# Altium PCB 328P_Board.PcbDoc
Units mm, origin at the board's own origin, x right, y up, seen from the top; angles counter-clockwise.
Board outline 78 x 66 mm, 2 copper layers (Top Layer, Bottom Layer), stack 1.569 mm thick; 71 components, 30 nets, 196 pads, 103 vias.
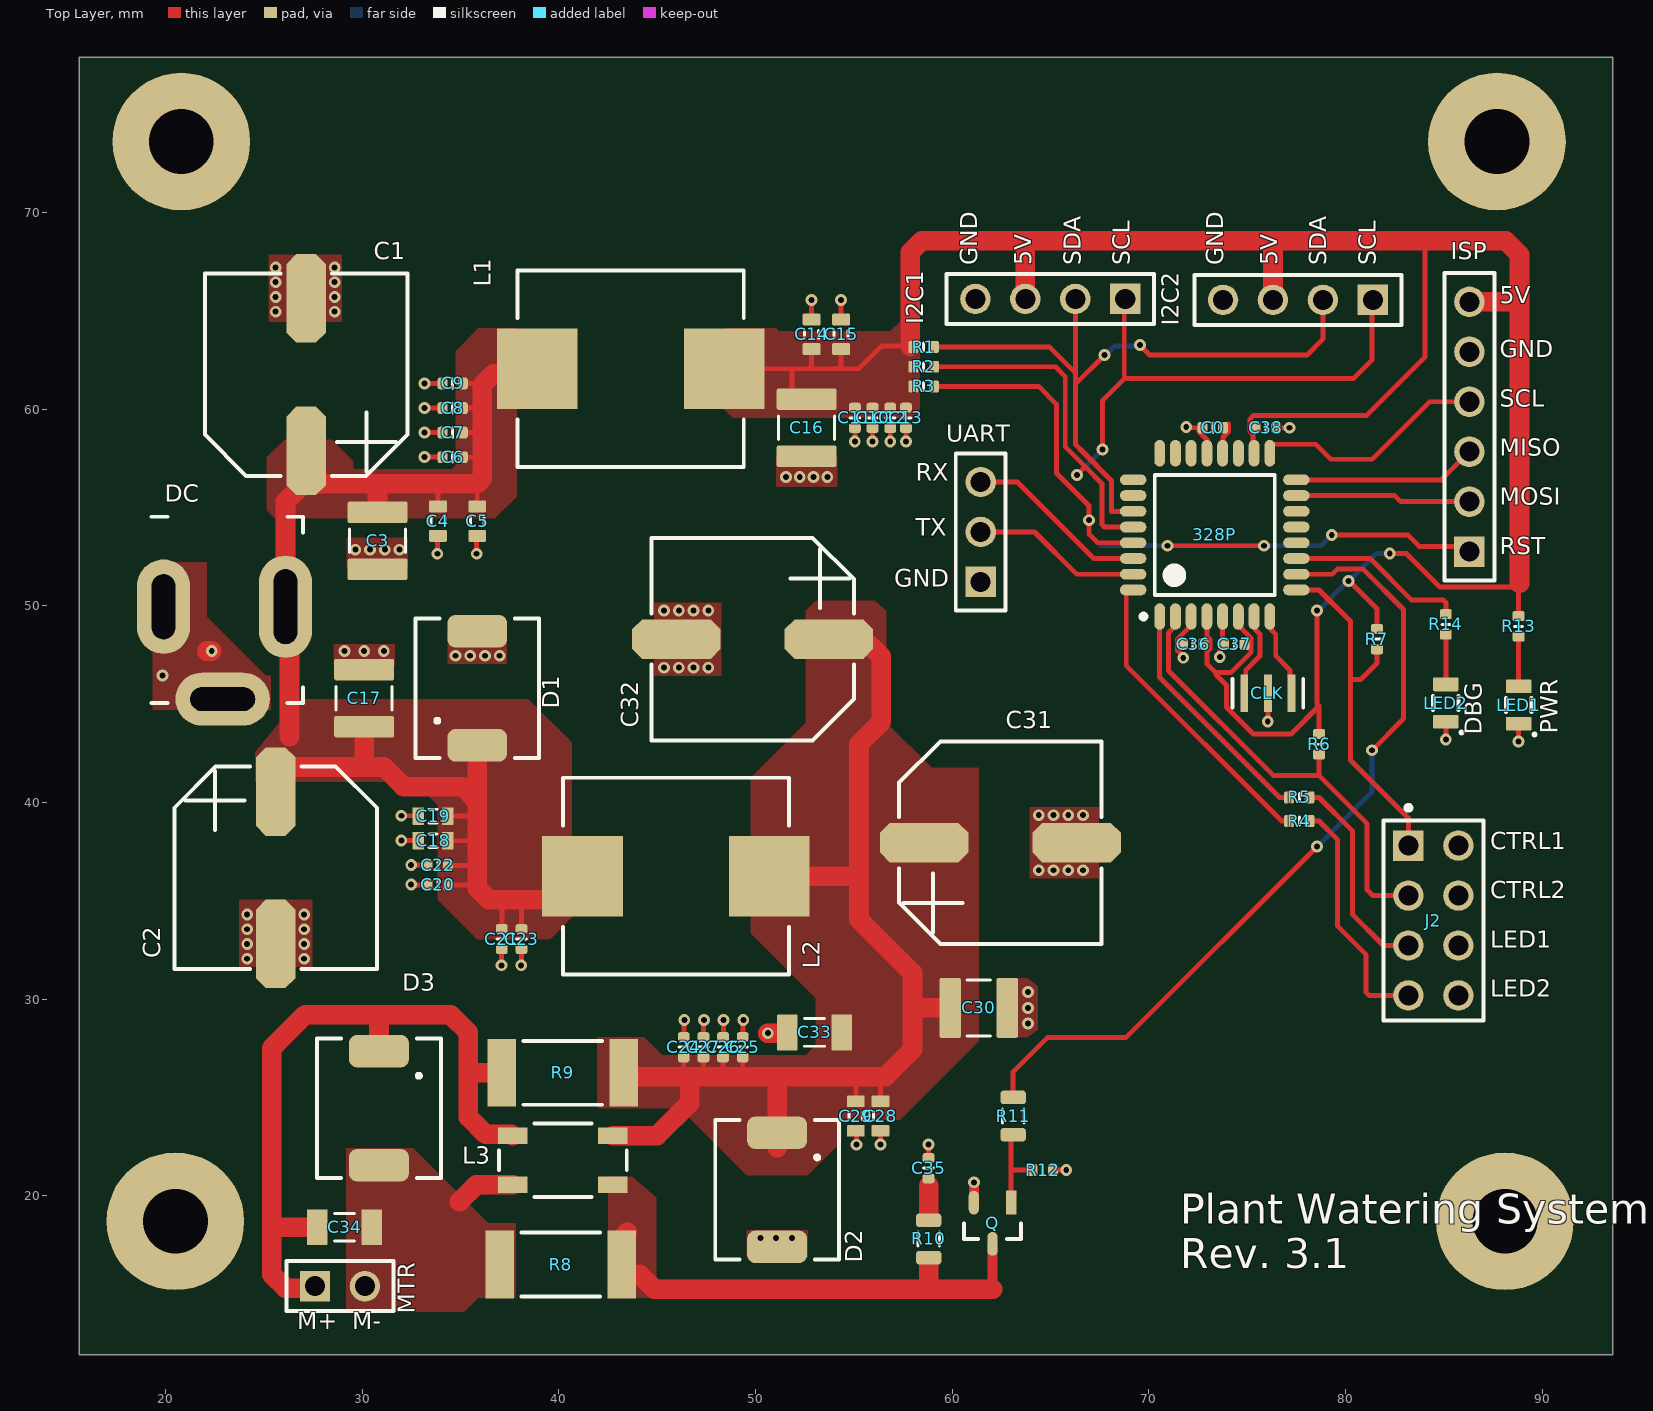
[diagram p0: Top Layer view]
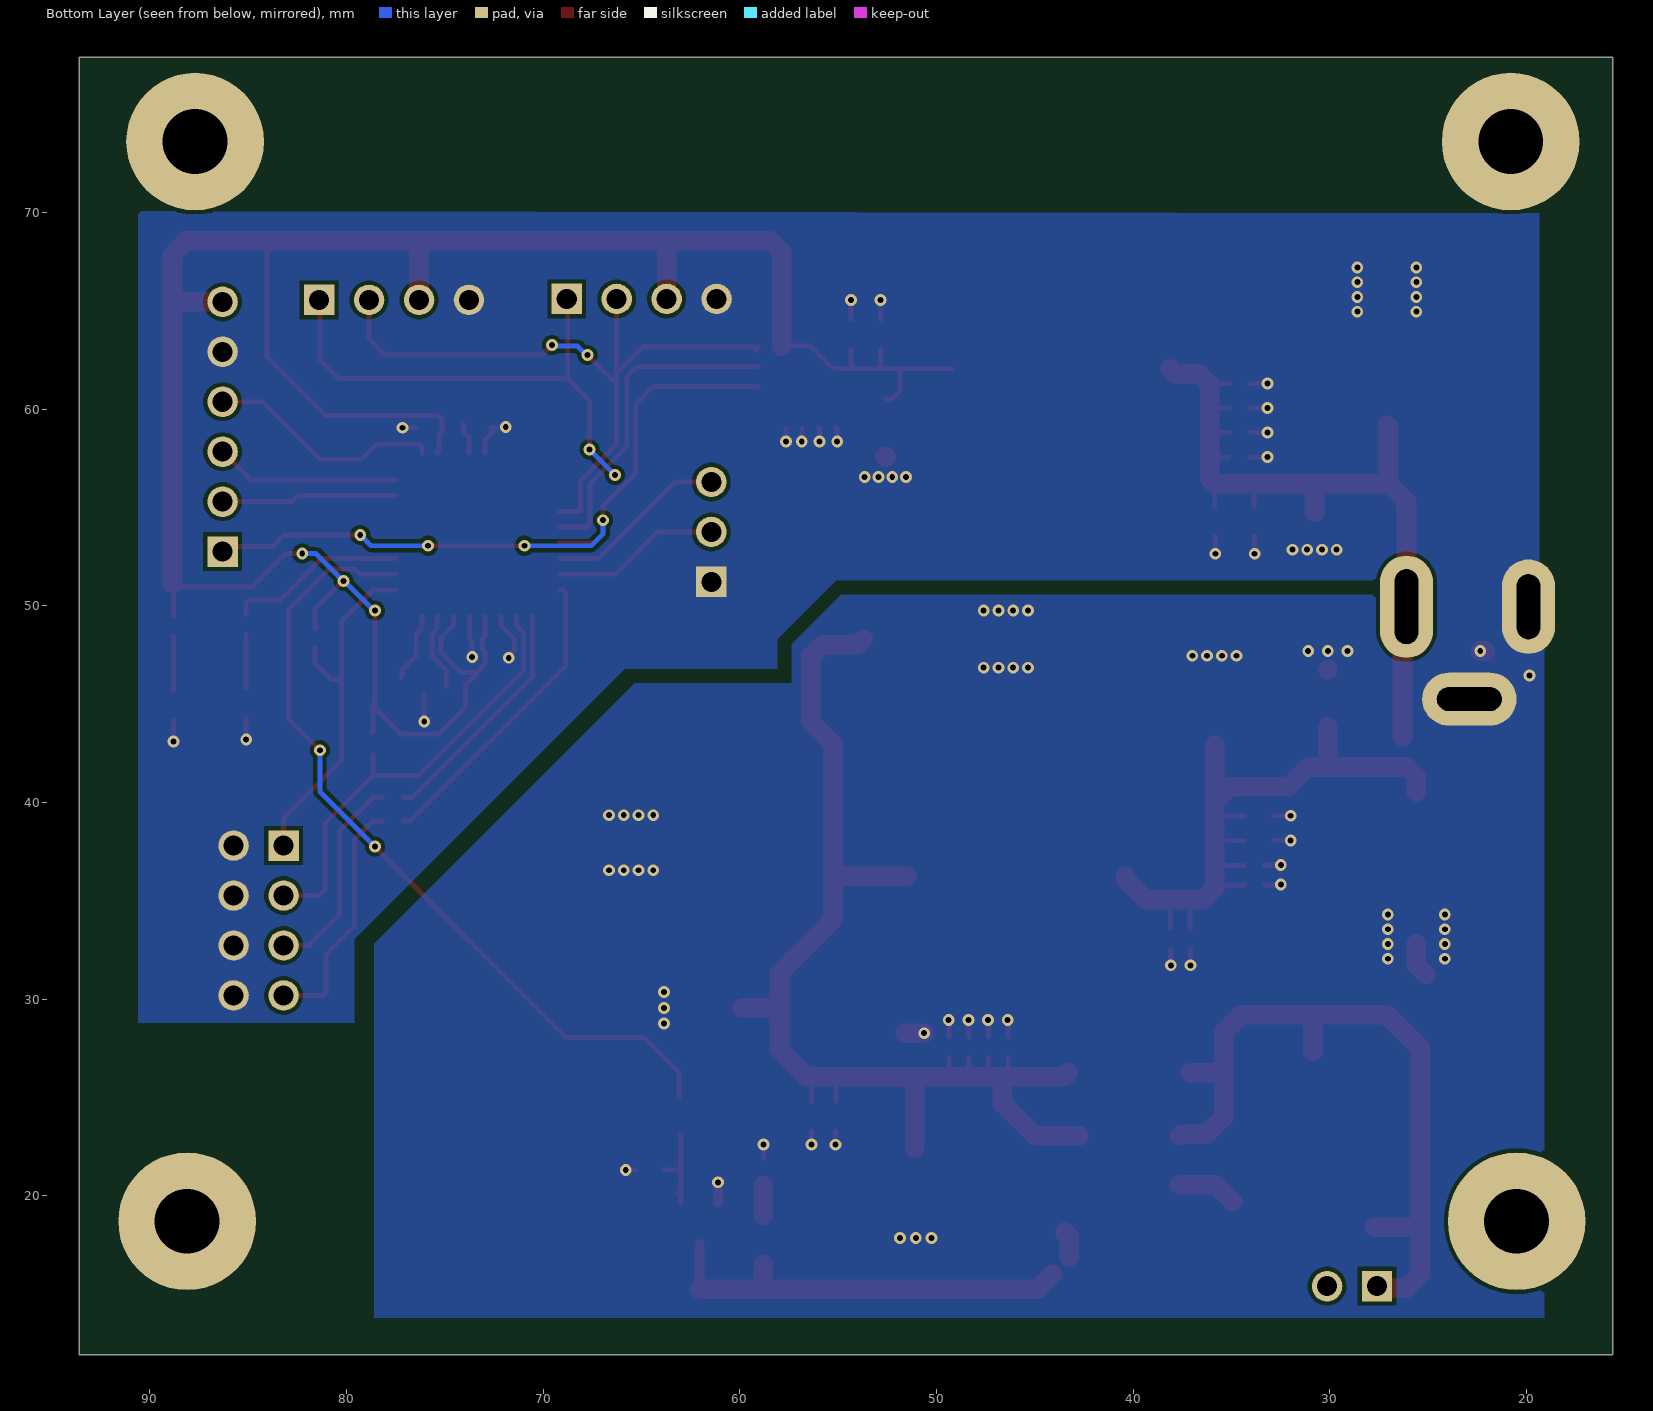
[diagram p1: Bottom Layer view, seen from below]

## Layer stack, top to bottom
Top Solder: solder mask 0.0254, SM-001, Dk 4
Top Layer: signal copper 0.035
Dielectric 1: core 1.4986, Core-043, Dk 4.3
Bottom Layer: signal copper 0.035
Bottom Solder: solder mask 0.0254, SM-001, Dk 4

## Board outline
15.6,11.9 93.6,11.9 93.6,77.9 15.6,77.9

## Design rules (kind name [scope] priority, off if disabled: settings)
AssemblyTestPointUsage [All] p1: isadvanced=TRUE
AssemblyTestpoint [All] p1: isadvanced=TRUE testpointundercomponent=TRUE minsize=1.016 maxsize=2.54 preferedsize=1.524 minholesize=0 maxholesize=1.016 preferedholesize=0.813 testpointgrid=0.025 usegrid=TRUE gridtolerance=0 allowsidetop=TRUE allowsidebottom=TRUE
Clearance Clearance_1 [OnMid vs OnMid] p1: gap=0.2 ignorepadtopadclearanceinfootprint=FALSE sourcerule=37 cellrowname=All cellrowtype=0 cellcolname=All cellcoltype=0 innerlayers=TRUE
Clearance Clearance_2 [(ExistsOnLayer('Top Layer') Or ExistsOnLayer('Bottom Layer')) vs (ExistsOnLayer('Top Layer') Or ExistsOnLayer('Bottom Layer'))] p2: gap=0.2 ignorepadtopadclearanceinfootprint=FALSE sourcerule=37 cellrowname=All cellrowtype=0 cellcolname=All cellcoltype=0 outerlayers=TRUE
Clearance [All] p3: gap=0.254 ignorepadtopadclearanceinfootprint=FALSE ismatrix=TRUE
ComponentClearance [All] p1: isadvanced=TRUE gap=0.254 collisioncheckmode=3 verticalgap=0.254 showdistances=FALSE
FabricationTestPointUsage [All] p1: isadvanced=TRUE valid=0 allowmultiple=FALSE
FabricationTestpoint [All] p1: isadvanced=TRUE side=3 testpointundercomponent=TRUE minsize=1.016 maxsize=2.54 preferedsize=1.524 minholesize=0 maxholesize=1.016 preferedholesize=0.813 testpointgrid=0.025 allowsidetop=TRUE allowsidebottom=TRUE usegrid=TRUE gridtolerance=0
FanoutControl Fanout_BGA [IsBGA] p1: isadvanced=TRUE bgadir=Out bgaviamode=Centered fanoutstyle=Auto fanoutdirection=Alternating viagrid=0.025 // Fanout_BGA (Default Rule)
FanoutControl Fanout_LCC [IsLCC] p2: isadvanced=TRUE bgadir=Out bgaviamode=Centered fanoutstyle=Auto fanoutdirection=Alternating viagrid=0.025 // Fanout_LCC (Default Rule)
FanoutControl Fanout_SOIC [IsSOIC] p3: isadvanced=TRUE bgadir=Out bgaviamode=Centered fanoutstyle=Auto fanoutdirection=Alternating viagrid=0.025 // Fanout_SOIC (Default Rule)
FanoutControl Fanout_Small [(CompPinCount < 5)] p4: isadvanced=TRUE bgadir=Out bgaviamode=Centered fanoutstyle=Auto fanoutdirection=OutThenIn viagrid=0.025 // Fanout_Small (Default Rule)
FanoutControl Fanout_Default [All] p5: isadvanced=TRUE bgadir=Out bgaviamode=Centered fanoutstyle=Auto fanoutdirection=Alternating viagrid=0.025 // Fanout_Default (Default Rule)
Height [All] p1: isadvanced=TRUE minheight=0 maxheight=25.4 prefheight=12.7
HoleSize [All] p1: isadvanced=TRUE absolutevalues=TRUE maxlimit=4 minlimit=0.2 maxpercent=80.000 minpercent=20.000
HoleToHoleClearance [All] p1: isadvanced=TRUE gap=0.3 allowstackedmicrovias=FALSE
LayerPairs [All] p1: isadvanced=TRUE enforce=TRUE
MinimumSolderMaskSliver [All] p1: isadvanced=TRUE minsoldermaskwidth=0.1
NetAntennae [All] p1: isadvanced=TRUE netantennaetolerance=0
PasteMaskExpansion [All] p1: isadvanced=TRUE expansion=0
PlaneClearance [All] p1: isadvanced=TRUE clearance=0.508
PlaneConnect [All] p1: isadvanced=TRUE planeconnectstyle=Relief reliefexpansion=0.508 reliefentries=4 reliefconductorwidth=0.254 reliefairgap=0.254
PolygonConnect [All] p1: connectstyle=Direct reliefconductorwidth=0.254 reliefentries=4 polygonreliefangle="90 Angle" airgapwidth=0.254
RoutingCorners [All] p1: isadvanced=TRUE cornerstyle=45-Degree minsetback=2.54 maxsetback=2.54
RoutingPriority [All] p1: isadvanced=TRUE routingpriority=0
RoutingVias [All] p1: holewidth=0 width=0.25 viastyle="Through Hole" minholewidth=0 minwidth=0.25 maxholewidth=0 maxwidth=0.25 useviatemplates=TRUE viatemplateguid#1={74C4EE52-B9B1-4AED-8B69-AA0912880850} viatemplatename#1=v60h30
ShortCircuit [All] p1: isadvanced=TRUE allowed=FALSE
SilkToSilkClearance [All] p1: isadvanced=TRUE silktosilkclearance=0.1
SilkToSolderMaskClearance [IsPad] p1: isadvanced=TRUE minsilkscreentomaskgap=0.1 clearancetoexposedcopper=TRUE
SolderMaskExpansion SolderMaskExpansionVia [IsVia] p1: isadvanced=TRUE expansion=0.05 istentingtop=FALSE useseparateexpansions=TRUE expansionbottom=0.05 istentingbottom=FALSE soldermaskfromhole=TRUE
SolderMaskExpansion [All] p2: isadvanced=TRUE expansion=0.05 istentingtop=FALSE
UnRoutedNet [All] p1: isadvanced=TRUE
UnpouredPolygon [All] p1: isadvanced=TRUE
Width [All] p1: maxlimit=1 minlimit=0.25 preferedwidth=1 minimp=50.000000 maximp=50.000000 favimp=50.000000
4 further rules are at their usual default settings.

## Classes and differential pairs
net class Power: GND

## Components (designator, comment, footprint, x,y, rotation, side; value= is the part's Value field where it differs from the comment)
328P "ATMEGA328P-AU" 32A_L 73.35,53.6 r90 top
C0 "100n" CAPC1005X55 73.25,59.05 r0 top
C1 "470u" CAPAE100X105 27.15,61.75 r180 top
C2 "470u" CAPAE100X105 25.6,36.675 r0 top
C3 "47u" CAPC3225X270 30.781,53.299 r90 top
C4 "2u2" CAPC1608X90 33.85,54.3 r90 top
C5 "2u2" CAPC1608X90 35.85,54.3 r90 top
C6 "100n" CAPC1005X55 34.6,57.55 r0 top
C7 "100n" CAPC1005X55 34.6,58.8 r0 top
C8 "100n" CAPC1005X55 34.6,60.05 r0 top
C9 "100n" CAPC1005X55 34.6,61.3 r0 top
C10 "100n" CAPC1005X55 55.95,59.55 r90 top
C11 "100n" CAPC1005X55 55.05,59.55 r90 top
C12 "100n" CAPC1005X55 56.85,59.55 r90 top
C13 "100n" CAPC1005X55 57.65,59.55 r90 top
C14 "2u2" CAPC1608X90 52.85,63.8 r90 top
C15 "2u2" CAPC1608X90 54.35,63.8 r90 top
C16 "47u" CAPC3225X270 52.6,59.05 r270 top
C17 "47u" CAPC3225X270 30.1,45.3 r270 top
C18 "2u2" CAPC1608X90 33.6,38.05 r0 top
C19 "2u2" CAPC1608X90 33.6,39.3 r0 top
C20 "100n" CAPC1005X55 33.85,35.8 r0 top
C21 "100n" CAPC1005X55 37.1,33.05 r90 top
C22 "100n" CAPC1005X55 33.85,36.8 r0 top
C23 "100n" CAPC1005X55 38.1,33.05 r90 top
C24 "100n" CAPC1005X55 46.35,27.55 r270 top
C25 "100n" CAPC1005X55 49.35,27.55 r270 top
C26 "100n" CAPC1005X55 48.35,27.55 r270 top
C27 "100n" CAPC1005X55 47.35,27.55 r270 top
C28 "2u2" CAPC1608X90 56.35,24.05 r270 top
C29 "2u2" CAPC1608X90 55.1,24.05 r270 top
C30 "47u" CAPC3225X270 61.35,29.55 r0 top
C31 "470u" CAPAE100X105 62.45,37.95 r90 top
C32 "470u" CAPAE100X105 49.85,48.3 r270 top
C33 "10u" CAPC3216X180 53,28.3 r180 top
C34 "10u" CAPC3216X180 29.1,18.4 r0 top
C35 "4n7" CAPC1005X55 58.8,21.4 r90 top
C36 "100n" CAPC1005X55 72.25,48.05 r0 top
C37 "100n" CAPC1005X55 74.35,48.05 r0 top
C38 "100n" CAPC1005X55 75.95,59.05 r180 top
CLK "CSTNE16M0V530000R0" FP-CSTNE16M0V530000R0-MFG 76.05,45.55 r180 top
D1 "SSC54" DIOM7959X262 35.85,45.8 r90 top
D2 "SSC54" DIOM7959X262 51.1,20.3 r270 top
D3 "SSC54" DIOM7959X262 30.85,24.45 r270 top
DC "694106301002" KYCON_KLDX-0202 19.45,49.95 r270 top value=3
I2C1 "TSW-104-08-L-S" SMTC-TSW-104-08-X-S 68.8,65.6 r180 top
I2C2 "TSW-104-08-L-S" SMTC-TSW-104-08-X-S 81.39,65.55 r180 top
ISP "TSW-106-07-L-S" SMTC-TSW-106-07-X-S 86.3,52.75 r90 top
J2 "TSW-104-08-L-D" SMTC-TSW-104-08-L-D_V 84.469,33.992 r270 top
L1 "FXL1050-470-M" FXL1050-470-M-Footprint-1 43.65,62.05 r0 top
L2 "FXL1050-470-M" FXL1050-470-M-Footprint-1 45.95,36.25 r0 top
L3 "744212221" WE-SL1_L6.5W3.6H1.65 1310.2,1291.8 r0 top value=220uH
LED1 "Red" LEDC2012X90 88.8,44.95 r90 top
LED2 "Red" LEDC2012X90 85.1,45.05 r90 top
MTR "TSW-102-26-L-S" SMTC-TSW-102-26-XX-S 27.6,15.4 r0 top
Q "AO3400A" FP-SOT23-IPC_C 62.05,18.6 r270 top
R1 "10k" RESC1005X40 58.55,63.15 r0 top
R2 "10k" RESC1005X40 58.55,62.15 r0 top
R3 "10k" RESC1005X40 58.55,61.15 r0 top
R4 "470R" RESC1005X40 77.65,39.05 r0 top
R5 "470R" RESC1005X40 77.65,40.25 r0 top
R6 "10k" RESC1005X40 78.655,42.955 r270 top
R7 "10k" RESC1005X40 81.6,48.3 r270 top
R8 "RC2512JK-7W2R2L" RC2512JK-7W2R2L-Footprint-1 40.1,16.5 r180 top value=2.2R
R9 "RC2512JK-7W2R2L" RC2512JK-7W2R2L-Footprint-1 40.2,26.25 r180 top value=2.2R
R10 "10R" RESC2012X65 58.8,17.8 r90 top
R11 "10R" RESC2012X65 63.1,24.05 r90 top
R12 "10k" RESC1005X40 64.6,21.3 r0 top
R13 "150R" RESC1005X40 88.8,48.95 r270 top
R14 "150R" RESC1005X40 85.1,49.05 r270 top
UART "TSW-103-07-T-S" SMTC-TSW-103-07-X-S 61.45,51.21 r90 top

## Footprints (in the part's own frame and the unit in brackets; to place one, negate y for a bottom-side part, rotate by r counter-clockwise, add the part's x,y. Pads: shape width x height; smd on the part's side, far side on the other; paste and mask are expansions set on the pad)
32A_L [mm] "Thin QFP, 32-Leads, Body 7x7mm, Pitch 0.8mm, IPC High Density"
  oval 1.35x0.55 smd: 1(-4.15,2.8) 2(-4.15,2) 3(-4.15,1.2) 4(-4.15,0.4) 5(-4.15,-0.4) 6(-4.15,-1.2) 7(-4.15,-2) 8(-4.15,-2.8) 17(4.15,-2.8) 18(4.15,-2) 19(4.15,-1.2) 20(4.15,-0.4) 21(4.15,0.4) 22(4.15,1.2) 23(4.15,2) 24(4.15,2.8)
  oval 0.55x1.35 smd: 9(-2.8,-4.15) 10(-2,-4.15) 11(-1.2,-4.15) 12(-0.4,-4.15) 13(0.4,-4.15) 14(1.2,-4.15) 15(2,-4.15) 16(2.8,-4.15) 25(2.8,4.15) 26(2,4.15) 27(1.2,4.15) 28(0.4,4.15) 29(-0.4,4.15) 30(-1.2,4.15) 31(-2,4.15) 32(-2.8,4.15)
  silkscreen extent -4.27,-3.05 3.05,3.75, body extent -3.5,-3.5 3.5,3.5, height 1.2
CAPAE100X105 [mm]
  oct 2x4.5 smd: 1(0,3.875) 2(0,-3.875)
  silkscreen extent -5.15,-5.15 5.15,5.15, body extent -4.28,-4.2 4.2,4.23, height 10.7
CAPC1005X55 [mm] "Chip Capacitor; Body 1.0 x 0.5 mm [0402]"
  rrect50% 0.5x0.6 smd: 1(-0.52,0) 2(0.52,0)
  silkscreen extent 0,-0.25 0,0.25, body extent -0.5,-0.25 0.5,0.25, height 0.55
CAPC1608X90 [mm] "Chip Capacitor; Body 1.0 x 0.5 mm [0603]"
  rrect20% 0.6x0.9 smd: 1(-0.75,0) 2(0.75,0)
  silkscreen extent -0.2,-0.35 0.2,0.35, body extent -0.8,-0.4 0.8,0.4, height 0.9
CAPC3216X180 [mm] "Chip Capacitor; Body 3.2 x 1.6 mm [1206]"
  rrect10% 1.05x1.82 smd: 1(-1.39,0) 2(1.39,0)
  silkscreen extent -0.5,-0.7 0.5,0.7, body extent -1.6,-0.8 1.6,0.8, height 1.8
CAPC3225X270 [mm] "Chip Capacitor, 2-Leads, Body 3,2x2,5mm, IPC High Density"
  rrect20% 1.1x3.05 smd: 1(-1.45,0) 2(1.45,0)
  silkscreen extent -0.6,-1.42 0.6,1.43, body extent -1.6,-1.25 1.6,1.25, height 2.79
DIOM7959X262 [mm] "SOT-23"
  rrect50% 1.65x3.05 smd: 1(-2.9,0) 2(2.9,0)
  silkscreen extent -3.55,-3.15 3.55,3.15, body extent -3.63,-3.11 3.63,3.11, height 2.63
FP-CSTNE16M0V530000R0-MFG [mm]
  rect 0.4x1.9 smd paste+0 mask+0: 1(1.2,0) 2(0,0) 3(-1.2,0)
  silkscreen extent -1.8,-0.72 1.8,0.73, body extent -1.78,-1.05 1.78,1.05, height 0.25
FP-SOT23-IPC_C [mm]
  rect 1.205x0.532 smd paste+0 mask+0: 1(-1.05,0.95)
  rrect100% 1.205x0.532 smd paste+0 mask+0: 2(-1.05,-0.95) 3(1.05,0)
  silkscreen extent 0,-1.45 0.8,1.45, body extent -1.75,-1.55 1.75,1.55, height 0.25
FXL1050-470-M-Footprint-1 [mm]
  rect 4.1x4.1 smd: 1(-4.75,0) 2(4.75,0)
  silkscreen extent -5.75,-5 5.75,5
KYCON_KLDX-0202 [mm] "Kycon KLDX-0202 Powe Jack"
  oval 5.2x2.7 hole 1.2 slot 3.8 at 0 deg: 1(0,6.65)
  oval 4.8x2.7 hole 1.2 slot 3.3 at 0 deg: 2(0,0.45)
  oval 2.7x4.8 hole 1.2 slot 3.3 at 90 deg: 3(4.7,3.45)
  silkscreen extent -4.57,-0.16 4.9,7.54, body extent -4.57,-6.94 4.9,7.54, height 11.18
LEDC2012X90 [mm] "Chip LED; Body 2.0 x 1.25 mm [0805]"
  rrect20% 0.7x1.3 smd: 1(-0.95,0) 2(0.95,0)
  silkscreen extent -1.5,-0.8 0.35,0.65, body extent -1,-0.65 1,0.65, height 0.9
RC2512JK-7W2R2L-Footprint-1 [mm]
  rect 1.45x3.45 smd: 1(-3.1,0) 2(3.1,0)
  silkscreen extent -2,-1.62 2,1.62, body extent -3.25,-1.7 3.25,1.7, height 0.75
RESC1005X40 [mm] "Chip Resistor; Body 1.0 x 0.5 mm [0402]"
  rrect30% 0.5x0.6 smd: 1(-0.52,0) 2(0.52,0)
  silkscreen extent 0,-0.2 0,0.2, body extent -0.5,-0.25 0.5,0.25, height 0.35
RESC2012X65 [mm] "Chip Resistor; Body 2.0 x 1.2 mm [0805]"
  rrect50% 0.7x1.3 smd: 1(-0.95,0) 2(0.95,0)
  silkscreen extent -0.35,-0.55 0.35,0.55, body extent -1,-0.65 1,0.65, height 0.65
SMTC-TSW-102-26-XX-S [mm] ".025 SQ Post Terminal Strip Assembly, 1x2 Pins, Vertical, 2.54mm Pitch, Male"
  rect 1.55x1.55 hole 1.02: 1(0,0)
  round 1.55 hole 1.02: 2(2.54,0)
  silkscreen extent -1.46,-1.27 4,1.27, body extent -1.4,-1.27 3.81,1.27, height 8.38
SMTC-TSW-103-07-X-S [mm] ".025 SQ Post Terminal Strip Assembly, 1x3 Pins, Vertical, 2.54mm Pitch, Male"
  rect 1.55x1.55 hole 1.02: 1(0,0)
  round 1.55 hole 1.02: 2(2.54,0) 3(5.08,0)
  silkscreen extent -1.46,-1.27 6.54,1.27, body extent -1.27,-1.27 6.35,1.27, height 8.38
SMTC-TSW-104-08-L-D_V [mm] "CONN, 8-Leads, Body 10.16x5.08mm, Pitch 2.54mm"
  rect 1.55x1.55 hole 1.02: 1(-3.81,-1.27)
  round 1.55 hole 1.02: 2(-3.81,1.27) 3(-1.27,-1.27) 4(-1.27,1.27) 5(1.27,-1.27) 6(1.27,1.27) 7(3.81,-1.27) 8(3.81,1.27)
  silkscreen extent -5.85,-2.54 5.08,2.54, body extent -5.08,-2.54 5.08,2.54, height 8.38
SMTC-TSW-104-08-X-S [mm] ".025 SQ Post Terminal Strip Assembly, 1x4 Pins, Vertical, 2.54mm Pitch, Male"
  rect 1.55x1.55 hole 1.02: 1(0,0)
  round 1.55 hole 1.02: 2(2.54,0) 3(5.08,0) 4(7.62,0)
  silkscreen extent -1.46,-1.27 9.08,1.27, body extent -1.27,-1.27 8.89,1.27, height 8.38
SMTC-TSW-106-07-X-S [mm] ".025 SQ Post Terminal Strip Assembly, 1x6 Pins, Vertical, 2.54mm Pitch, Male"
  rect 1.55x1.55 hole 1.02: 1(0,0)
  round 1.55 hole 1.02: 2(2.54,0) 3(5.08,0) 4(7.62,0) 5(10.16,0) 6(12.7,0)
  silkscreen extent -1.46,-1.27 14.16,1.27, body extent -1.27,-1.24 13.97,1.3, height 8.38
WE-SL1_L6.5W3.6H1.65 [mm] "SMD Inductor, 4-Leads, Body 6.5x3.6mm"
  rect 1.5x0.85 smd: 1(-1267.45,-1268.75) 3(-1267.45,-1271.25) 4(-1272.55,-1271.25) 5(-1272.55,-1268.75)
  silkscreen extent -1273.25,-1271.88 -1266.75,-1268.13, body extent -1272.6,-1271.8 -1267.4,-1268.2, height 1.65

## Part data
328P: library part CMP-00014-1, "RISC Microcontroller, 8-Bit, FLASH, AVR RISC CPU, 20MHz, CMOS, PQFP32", Case/Package=TQFP, Clock Frequency=20MHz, Max Operating Temperature=85°C, Max Supply Current=9mA, Max Supply Voltage=5.5V, Min Operating Temperature=-40°C, Min Supply Voltage=4.5V, Nominal Supply Voltage=5V, Package Body Material=Plastic, Package Shape=Square, Peak Reflow Temperature (Cel)=260°C, Power Supplies=2.5, Temperature Grade=INDUSTRIAL, Time @ Peak Reflow Temperature-Max (s)=40s, Height - Seated (Max)=1.2mm, Interface=SPI,USART, JESD-30 Code=S-PQFP-G32, JESD-609 Code=e3, Length=7mm, Moisture Sensitivity Level=3, Number of I/O Lines=23, Peripherals=POR,PWM,WDT, Pins=32, Qualification Status="Not Qualified", Reach SVHC Compliant=Yes, RoHS Compliant=Yes, Surface Mount=Yes, Technology=CMOS, Terminal Finish=Tin, Terminal Form="Gull Wing", Terminal Pitch=0.8mm, Terminal Position=QUAD, Width=7mm
C0 C6 C7 C8 C9 C10 C11 C12 C13 C20 C21 C22 C23 C24 C25 C26 C27 C36 C37 C38: library part 1066, "Ceramic Chip Capacitor", Dielectric=Ceramic, LCSC Part Number=C1525, Manufacturer=Kemet, Manufacturer ID=C0402C104K4RAC, Tolerance=±15%, Voltage=16V, Characteristic=X7R, ComponentLink1Description=Website, ComponentLink1URL=http://kemet.com/, ComponentLink2Description=Datasheet, ComponentLink2URL=http://www.kemet.com/kemet/web/homepage/kechome.nsf/vapubfiles/F3102_X7R.pdf/$file/F3102_X7R.pdf, Digikey=399-3521-1-ND, Distributor 3=Mouser, Distributor Number 3=80-C0402C104K4RAUTO, Farnell=1288252, Footprint / Size=C0402, ID=1066, Quantity=0, Type=MLCC, UBiKS Number=UBiKS-C00001I, Unit Price=0
C1 C2 C31 C32: library part 1097, "Aluminum Electrolytic Capacitors", Dielectric=Electrolyt, Manufacturer=Panasonic, Manufacturer ID=EEE-FK1E471P, Tolerance=±20%, Voltage=25V, ComponentLink1Description=Website, ComponentLink1URL=http://industrial.panasonic.com/, ComponentLink2Description=Datasheet, ComponentLink2URL=http://industrial.panasonic.com/www-data/pdf/ABA0000/ABA0000CE120.pdf, Digikey=PCE3805CT-ND, Distributor 4="Wuerth Elektronik", Distributor Number 4=865080457015, Farnell=9695800, Footprint / Size=CAPAE10083X102M, ID=1097, Quantity=0, Type=Aluminium/Electrolytic, UBiKS Number=UBiKS-C00031X, Unit Price=0
C3 C16 C17 C30: library part 1207, "Ceramic Chip Capacitor", Dielectric=Ceramic, Manufacturer="Taiyo Yuden", Manufacturer ID=EMK325BJ476MM-T, Tolerance=±20%, Voltage=16V, Characteristic=X5R, ComponentLink1Description=Website, ComponentLink1URL=http://www.yuden.co.jp/, ComponentLink2Description=Datasheet, ComponentLink2URL=http://www.yuden.co.jp/ut/product/pdf/djmk_e.pdf, Digikey=587-1436-2-ND, Farnell=1611919, Footprint / Size=C1210, ID=1207, Quantity=0, Type=MLCC, UBiKS Number=UBiKS-C00115P, Unit Price=0
C4 C5 C14 C15 C18 C19 C28 C29: library part 1206, "Ceramic Chip Capacitor", Dielectric=Ceramic, Manufacturer=Kemet, Manufacturer ID=C0603C225K4PACTU, Tolerance=±10%, Voltage=16V, Characteristic=X5R, ComponentLink1Description=Website, ComponentLink1URL=http://kemet.com/, ComponentLink2Description=Datasheet, ComponentLink2URL=http://www.kemet.com/kemet/web/homepage/kechome.nsf/vapubfiles/F3102_X5R.pdf/$file/F3102_X5R.pdf, Farnell=1288203, Footprint / Size=C0603, ID=1206, Type=MLCC, UBiKS Number=UBiKS-C00114J
C33 C34: library part 1283, "Ceramic Chip Capacitor", Dielectric=Ceramic, LCSC Part Number=C13585, Manufacturer=Samsung, Manufacturer ID=CL31A106MBHNNNE, Tolerance=±20%, Voltage=50V, Characteristic=X5R, ComponentLink1Description=Website, ComponentLink1URL=https://www.samsungsem.com/, ComponentLink2Description=Datasheet, ComponentLink2URL=www.samsungsem.com/kr/support/product-search/mlcc/CL21A475KBQNNNE.jsp, Digikey=1276-6736-1-ND, Distributor 4="Wuerth Elektronik", Distributor Number 3=187-CL31B106KBHNNNE, Distributor Number 4=885012108022, Footprint / Size=C1206, ID=1283, Type=MLCC, UBiKS Number=UBiKS-C00170P
C35: library part 1086, "Ceramic Chip Capacitor", Dielectric=Ceramic, Manufacturer=Kemet, Manufacturer ID=C0402C472K5RAC, Tolerance=±15%, Voltage=50V, Characteristic=X7R, ComponentLink1Description=Website, ComponentLink1URL=http://kemet.com/, ComponentLink2Description=Datasheet, ComponentLink2URL=http://www.kemet.com/kemet/web/homepage/kechome.nsf/vapubfiles/F3102_X7R.pdf/$file/F3102_X7R.pdf, Farnell=1414594, Footprint / Size=C0402, ID=1086, Quantity=0, Type=MLCC, UBiKS Number=UBiKS-C00021S, Unit Price=0
CLK: library part CMP-00020-1, "Ceramic Resonator, 16MHz Nom", Frequency Stability=0.3%, Frequency Tolerance=5000ppm, Max Operating Temperature=85°C, Min Operating Temperature=-40°C, Operating Frequency-Nom=160, Crystal/Resonator Type="CERAMIC RESONATOR", Mounting Technology="Surface Mount", Reach SVHC Compliant=Yes, RoHS Compliant=Yes
D1 D2 D3: library part 4003, "Schottky Diode", LCSC Part Number=C16103, Manufacturer=Vishay, Manufacturer ID=SSC54-E3/9AT, ComponentLink1Description=Website, ComponentLink1URL=http://www.vishay.com/, ComponentLink2Description=Datasheet, ComponentLink2URL=http://www.vishay.com/docs/88885/88885.pdf, Digikey=SSC54-E3/9ATGICT-ND, Distributor 3=Mouser, Distributor Number 3=625-SSC54-E3/9AT, Farnell=1336559, Footprint / Size=D_SMC, ID=4003, Type=Schottky, UBiKS Number=UBiKS-D00002P
DC: library part 9655, "DC Power Jack, 5.5x2.1mm, 6.4mm Opening DC power jack", Manufacturer="Wuerth Elektronik", ComponentLink1Description=Website, ComponentLink1URL=https://www.we-online.com/en/components/products/DC_RIGHT_ANGLED_6_4_69410X301002, ComponentLink2Description=Datasheet, ComponentLink2URL=https://www.we-online.com/components/media/o664242v410%20info-wr-dc-power-jacks-connector.pdf, Distributor 3=Mouser, Distributor 4="Wuerth Elektronik", Distributor Number 3=806-KLDX-0202-A, Distributor Number 4=694106301002, Footprint / Size=DCJACK-5.5x2.1, ID=9655, Manufacturer ID=694106301002, Orientation=H, Pitch=4.00mm, Serie=WR-DC, SMD/THT=THT, Type="W2B - Power", UBiKS Number=UBiKS-P00127T
I2C1 I2C2: library part CMP-00016-1, "Board Connector, 4 Contact(s), 1 Row(s), Male, Straight, Solder Terminal", Manufacturer Series=TSW, Additional Feature=E.L.P., Connector Type="BOARD CONNECTOR", Contact Finish - Mating="GOLD (10) OVER NICKEL (50)", Contact Finish - Termination="MATTE TIN OVER NICKEL (50)", Contact Gender=Male, Contact Material=Bronze, DIN Conformance=No, Filter Feature=No, IEC Conformance=No, JESD-609 Code=e3, Mating Information="MULTIPLE MATING PARTS AVAILABLE", MIL Conformance=No, Mixed Contacts=No, Mounting Style=STRAIGHT, Mounting Technology=Board, Number of Contacts=4, Number of Rows Loaded=1, Option="General Purpose", Reach SVHC Compliant=Yes, RoHS Compliant=Yes, Terminal Pitch=2.54mm, Termination=Solder
ISP: library part CMP-00027-1, "Board Connector, 6 Contact(s), 1 Row(s), Male, Straight, 0.1 inch Pitch, Solder Terminal, Black Insulator, Receptacle", Flammability Rating="UL94 V-0", Insulation Color=Black, Additional Feature=E.L.P., Body Breadth=0.1inch, Body Depth=0.1inch, Body/Shell Style=RECEPTACLE, Connector Type="BOARD CONNECTOR", Contact Finish - Mating="GOLD (10) OVER NICKEL (50)", Contact Finish - Termination="Matte Tin (Sn) - with Nickel (Ni) barrier", Contact Gender=Male, Contact Material=Bronze, Contact Pattern=RECTANGULAR, Contact Style="SQ PIN-SKT", DIN Conformance=No, Filter Feature=No, IEC Conformance=No, Insulation Material=Glass, JESD-609 Code=e3, Mating Contact Pitch=0.1inch, Mating Information="MULTIPLE MATING PARTS AVAILABLE", MIL Conformance=No, Mixed Contacts=No, Mounting Style=STRAIGHT, Mounting Technology=Board, Number Of Connectors=1, Number of Contacts=6, Number Of PCB Rows=1, Number of Rows Loaded=1, Option="General Purpose", PCB Contact Pattern=RECTANGULAR, Plating Thickness=10uin, Reach SVHC Compliant=Yes, Reference Standard=UL, Reliability=COMMERCIAL, RoHS Compliant=Yes, Terminal Length=0.1inch, Terminal Pitch=2.54mm, Termination=Solder
J2: library part CMP-00029-1, "Board Connector, 8 Contact(s), 2 Row(s), Male, Straight, 0.1 inch Pitch, Solder Terminal, Black Insulator, Receptacle", Insulation Color=Black, Additional Feature=E.L.P., Body Breadth=0.1inch, Body Depth=0.1inch, Body/Shell Style=RECEPTACLE, Connector Type="BOARD CONNECTOR", Contact Finish - Mating="GOLD (10) OVER NICKEL (50)", Contact Finish - Termination="Matte Tin (Sn) - with Nickel (Ni) barrier", Contact Gender=Male, Contact Material=Bronze, Contact Pattern=RECTANGULAR, Contact Style="SQ PIN-SKT", DIN Conformance=No, Filter Feature=No, IEC Conformance=No, Insulation Material=Glass, JESD-609 Code=e3, Mating Contact Pitch=0.1inch, Mating Contact Row Spacing=0.1inch, Mating Information="MULTIPLE MATING PARTS AVAILABLE", MIL Conformance=No, Mixed Contacts=No, Mounting Style=STRAIGHT, Mounting Technology=Board, Number Of Connectors=1, Number of Contacts=8, Number Of PCB Rows=2, Number of Rows Loaded=2, Option="General Purpose", PCB Contact Pattern=RECTANGULAR, PCB Contact Row Spacing=5.08mm, Plating Thickness=10uin, Reach SVHC Compliant=Yes, Reference Standard=UL, Reliability=COMMERCIAL, RoHS Compliant=Yes, Terminal Length=0.2inch, Terminal Pitch=2.54mm, Termination=Solder
L1 L2: library part CMP-00038-1
L3: library part CMP-00022-1, "Data Line Filter, 2 Function(s), 80V, 0.3A, 4 Pin(s)", Current Rating=300mA, DC Resistance-Max=280mR, Max Operating Temperature=105°C, Min Operating Temperature=-40°C, Voltage Rating=80V, Approvals=ULV, Channels=2, Filter Type="DATA LINE FILTER", Height=1.65mm, JESD-609 Code=e1, Length=6.5mm, Mounting Technology="Surface Mount", Output Impedance=1.2kR, Packaging="Tape and Reel", Reach SVHC Compliant=Yes, RoHS Compliant=Yes, Terminal Finish=Copper, Width=3.6mm
LED1 LED2: library part 6010, "SMD Chip LED", Color=red, LCSC Part Number=C84256, Manufacturer=Avago, Manufacturer ID=HSMS-C170, ComponentLink1Description=Website, ComponentLink1URL=http://www.avagotech.com/, ComponentLink2Description=Datasheet, ComponentLink2URL=http://www.avagotech.com/docs/AV02-0376EN, Digikey=160-1422-6-ND, Distributor 3=Mouser, Distributor 4=Wuerth, Distributor Number 3=630-HSMS-C170, Distributor Number 4=150080RS75000, Farnell=5790839, Footprint / Size=LED0805, ID=6010, Type="Standard LED", UBiKS Number=UBiKS-V00002H
MTR: library part CMP-00036-2, "Board Connector, 2 Contact(s), 1 Row(s), Male, Straight, 0.1 inch Pitch, Solder Terminal, Black Insulator, Receptacle", Flammability Rating="UL94 V-0", Insulation Color=Black, Additional Feature=E.L.P., Body Breadth=0.1inch, Body Depth=0.1inch, Body/Shell Style=RECEPTACLE, Connector Type="BOARD CONNECTOR", Contact Finish - Mating="GOLD (10) OVER NICKEL (50)", Contact Finish - Termination="Matte Tin (Sn) - with Nickel (Ni) barrier", Contact Gender=Male, Contact Material=Bronze, Contact Pattern=RECTANGULAR, Contact Style="SQ PIN-SKT", DIN Conformance=No, Filter Feature=No, IEC Conformance=No, Insulation Material=Glass, JESD-609 Code=e3, Mating Contact Pitch=0.1inch, Mating Information="MULTIPLE MATING PARTS AVAILABLE", MIL Conformance=No, Mixed Contacts=No, Mounting Style=STRAIGHT, Mounting Technology=Board, Number Of Connectors=1, Number of Contacts=2, Number Of PCB Rows=1, Number of Rows Loaded=1, Option="General Purpose", PCB Contact Pattern=RECTANGULAR, Plating Thickness=10uin, Reach SVHC Compliant=Yes, Reference Standard=UL, Reliability=COMMERCIAL, RoHS Compliant=Yes, Terminal Length=0.126inch, Terminal Pitch=2.54mm, Termination=Solder
Q: library part CMP-00027-1, "Small Signal Field-Effect Transistor, 5.7A I(D), 30V, 1-Element, N-Channel, Silicon, Metal-oxide Semiconductor FET", Drain Current-Max (ID)=5.7A, Drain-source On Resistance-Max=26.5mR, DS Breakdown Voltage-Min=30V, Operating Mode="ENHANCEMENT MODE", Package Body Material=Plastic, Package Shape=Rectangular, Package Style="SMALL OUTLINEMeter", FET Technology="METAL-OXIDE SEMICONDUCTOR", JESD-30 Code=R-PDSO-G3, Number of Elements=1, Pins=3, Polarity/Channel Type=N-CHANNEL, Reach SVHC Compliant=Yes, RoHS Compliant=Yes, Surface Mount=Yes, Terminal Form="Gull Wing", Terminal Position=DUAL, Transistor Application=SWITCHING, Transistor Element Material=SILICON
R1 R2 R3 R6 R7 R12: library part 2123, "Resistor", LCSC Part Number=C25744, Manufacturer=Multicomp, Manufacturer ID="MC 0.0625W 0402 1% 10K", Power rating=0.063W, Temperatur coeff=±100ppm/°C, Tolerance=±1%, ComponentLink1Description=Website, ComponentLink2Description=Datasheet, ComponentLink2URL=http://www.farnell.com/datasheets/318400.pdf, Element Type="Thick Film", Farnell=1358069, Footprint / Size=R0402, ID=2123, Type=Standard, UBiKS Number=UBiKS-R00007H
R4 R5: library part 2151, "Resistor", LCSC Part Number=C25117, Manufacturer=Multicomp, Manufacturer ID="MC 0.0625W 0402 1% 470R", Power rating=0.063W, Temperatur coeff=±100ppm/°C, Tolerance=±1%, ComponentLink1Description=Website, ComponentLink2Description=Datasheet, ComponentLink2URL=http://www.farnell.com/datasheets/318400.pdf, Element Type="Thick Film", Farnell=1358034, Footprint / Size=R0402, ID=2151, Type=Standard, UBiKS Number=UBiKS-R00035K
R8 R9: library part CMP-00021-2, "Fixed Resistor, Metal Glaze/thick Film, 2W, 2.2ohm, 200V, 5% +/-Tol, 200ppm/Cel, Surface Mount, 2512", Case/Package=2512, Max Operating Temperature=155°C, Min Operating Temperature=-55°C, Package Height=0.55mm, Package Length=6.35mm, Package Shape=Rectangular, Package Width=3.1mm, Power=2W, Rated Temperature=70°C, Resistor Type="FIXED RESISTOR", Temperature Coefficient (ppm/Cel)=200, Tolerance=5%, Working Voltage=200V, Additional Feature="LASER TRIMMABLE", Construction=Chip, JESD-609 Code=e3, Mounting Technology="Surface Mount", Packaging="Tape and Reel", Pins=2, Reach SVHC Compliant=Yes, RoHS Compliant=Yes, Technology="METAL GLAZE/THICK FILM", Terminal Finish=Nickel, Termination=Wraparound
R10 R11: library part 2526, "Resistor", LCSC Part Number=C17415, Manufacturer=Multicomp, Manufacturer ID="MC 0.1W 0805 1% 10R", Power rating=0.1W, Temperatur coeff=±200ppm/°C, Tolerance=±1%, ComponentLink1Description=Website, ComponentLink2Description=Datasheet, ComponentLink2URL=http://www.farnell.com/datasheets/34922.pdf, Element Type="Thick Film", Farnell=9332421, Footprint / Size=R0805, ID=2526, Quantity=0, Type=Standard, UBiKS Number=UBiKS-R00342J, Unit Price=0
R13 R14: library part 2219, "Resistor", LCSC Part Number=C25082, Manufacturer=Multicomp, Manufacturer ID="MC 0.0625W 0402 1% 150R", Power rating=0.063W, Temperatur coeff=±100ppm/°C, Tolerance=±1%, ComponentLink1Description=Website, ComponentLink2Description=Datasheet, ComponentLink2URL=http://www.farnell.com/datasheets/318400.pdf, Element Type="Thick Film", Farnell=1358020, Footprint / Size=R0402, ID=2219, Type=Standard, UBiKS Number=UBiKS-R00096U
UART: library part CMP-00028-1, "Board Connector, 3 Contact(s), 1 Row(s), Male, Straight, 0.1 inch Pitch, Solder Terminal, Black Insulator, Receptacle", Flammability Rating="UL94 V-0", Insulation Color=Black, Additional Feature=E.L.P., Body Breadth=0.1inch, Body Depth=0.1inch, Body/Shell Style=RECEPTACLE, Connector Type="BOARD CONNECTOR", Contact Finish - Mating="MATTE TIN OVER NICKEL (50)", Contact Finish - Termination="Tin (Sn) - with Nickel (Ni) barrier", Contact Gender=Male, Contact Material=Bronze, Contact Pattern=RECTANGULAR, Contact Style="SQ PIN-SKT", DIN Conformance=No, Filter Feature=No, IEC Conformance=No, Insulation Material=Glass, JESD-609 Code=e3, Mating Contact Pitch=0.1inch, Mating Information="MULTIPLE MATING PARTS AVAILABLE", MIL Conformance=No, Mixed Contacts=No, Mounting Style=STRAIGHT, Mounting Technology=Board, Number Of Connectors=1, Number of Contacts=3, Number Of PCB Rows=1, Number of Rows Loaded=1, Option="General Purpose", PCB Contact Pattern=RECTANGULAR, Reach SVHC Compliant=Yes, Reference Standard=UL, Reliability=COMMERCIAL, RoHS Compliant=Yes, Terminal Length=0.1inch, Terminal Pitch=2.54mm, Termination=Solder

## Free pads (board coordinates)
  round 7 hole 3.3: 7(20.5,18.7) 7(20.8,73.6) 7(87.7,73.6) 7(88.1,18.7)

## Via types
v1: diameter 0.6, hole 0.3, Top Layer to Bottom Layer, 103 vias

## Nets (pads, with @x,y where several pads share a name; then routed paths per layer and width w, separated by ;. In a path a pad name is that pad's centre, name@x,y a point inside that pad or via, vN(x,y) a via of type N, cw(c..) or ccw(c..) an arc to the next point about the centre after c; other vN are vias at no path point)
BTN1: 328P.2 J2.3 R6.2 | length 22.9
  Top Layer w0.25: 328P.2 71.35,48.969 71,48.619 71,46.7 76.343,41.357 78.655,41.357 ; R6.2 78.655,41.357 ; J2.3 81.388,35.262 81.1,35.55 81.1,38.912 78.655,41.357
BTN2: 328P.9 J2.1 R7.2 | length 18.5
  Top Layer w0.25: 328P.9 78.65,50.8 80.25,49.2 80.25,46.25 ; R7.2@81.6,47.871 81.6,47.079 80.771,46.25 80.25,46.25 ; J2.1 83.199,39.201 80.25,42.15 80.25,46.25
DBG: 328P.11 R14.1 | length 9.1
  Top Layer w0.25: 328P.11 81.25,52.4 83.35,50.3 84.954,50.3 85.1,50.154 R14.1
GATE: Q.1 R11.1 R12.1 | length 4.5
  Top Layer w0.25: Q.1 Q.1@63,19.987 ; R11.1 63,23 63,21.3 ; Q.1@63.141,20.128 Q.1@63,19.987 ; R12.1@63.85,21.3 63,21.3 ; Q.1@63,19.987 63,21.3
GND: 328P.3 328P.5 328P.21 C0.1 C1.2 C2.2 C3.1 C4.1 C5.1 C6.1 C7.1 C8.1 C9.1 C10.1 C11.1 C12.1 C13.1 C14.2 C15.2 C16.2 C17.1 C18.1 C19.1 C20.1 C21.1 C22.1 C23.1 C24.1 C25.1 C26.1 C27.1 C28.2 C29.2 C30.2 C31.2 C32.2 C33.2 C35.2 C36.1 C37.1 C38.1 CLK.2 D1.2 D2.2 DC.2 DC.3 I2C1.4 I2C2.4 ISP.5 J2.2 J2.4 J2.6 J2.8 LED1.1 LED2.1 Q.2 R12.2 UART.1 | length 36.6
  Top Layer w0.25: v1(31.99,38.068) 32.832,38.068 C18.1 ; v1(31.99,39.318) 32.832,39.318 C19.1 ; v1(32.49,35.818) 32.499,35.809 33.321,35.809 C20.1 ; v1(32.49,36.818) 32.499,36.809 33.321,36.809 C22.1 ; v1(33.174,57.555) 33.177,57.552 34.078,57.552 C6.1 ; v1(33.174,58.805) 33.177,58.802 34.078,58.802 C7.1 ; v1(33.174,60.055) 33.177,60.052 34.078,60.052 C8.1 ; v1(33.174,61.305) 33.177,61.302 34.078,61.302 C9.1 ; v1(33.82,52.641) 33.82,53.52 C4.1 ; v1(35.82,52.641) 35.82,53.52 C5.1 ; v1(37.082,31.715) 37.091,31.724 37.091,32.521 C21.1 ; v1(38.082,31.715) 38.091,31.724 38.091,32.521 C23.1 ; C24.1 46.364,28.084 46.364,28.917 v1(46.379,28.932) ; C27.1 47.364,28.084 47.364,28.917 v1(47.379,28.932) ; C26.1 48.364,28.084 48.364,28.917 v1(48.379,28.932) ; C25.1 49.364,28.084 49.364,28.917 v1(49.379,28.932) ; C14.2 v1(52.85,65.55) ; C15.2 v1(54.35,65.55) ; v1(55.05,58.35) C11.1 ; C29.2 55.14,23.26 v1(55.14,22.595) ; v1(55.95,58.35) C10.1 ; v1@56.35,22.7 C28.2 ; v1(56.85,58.35) C12.1 ; v1(57.65,58.35) C13.1 ; C35.2 v1(58.8,22.6) ; Q.2 Q.2@61.102,19.653 ; v1@61.102,20.679 v1(61.104,20.681) ; R12.2@65.301,21.3 v1(65.8,21.3) ; v1(71.75,47.35) 71.75,47.445 71.45,47.745 71.45,48.301 72.15,49.001 328P.3 ; v1(71.901,59.08) 71.931,59.05 C0.1@72.55,59.05 ; C0.1 C0.1@72.55,59.05 ; 328P.21 72.95,58.45 72.55,58.85 C0.1@72.55,59.05 ; v1(73.608,47.392) 73.608,48.208 73.75,48.35 328P.5 ; v1(76.047,44.104) 76.048,44.106 76.048,45.548 CLK.2 ; C38.1 v1(77.15,59.05) ; v1(85.1,43.2) LED2.1@85.1,44.3 ; v1(88.8,43.1) LED1.1@88.8,44.2
  Top Layer w0.5: Q.2@61.102,19.653 v1@61.102,20.679
  Top Layer w1: v1@22.1,47.7 v1(22.35,47.7) ; C2.2@25.1,31.257 25.6,31.757 C2.2 ; v1(50.626,28.264) C33.2@51.585,28.264 ; C16.2@52.55,57.55 C16.2
  other v1: 50.25,17.85 51.05,17.85 51.85,17.85 56.35,22.6 63.85,28.75 63.85,29.55 63.85,30.35 24.15,32.05 27.05,32.05 24.15,32.8 27.05,32.8 24.15,33.55 27.05,33.55 24.15,34.3 27.05,34.3 64.4,36.55 65.15,36.55 65.9,36.55 66.65,36.55 64.4,39.35 65.15,39.35 65.9,39.35 66.65,39.35 19.85,46.45 45.35,46.85 46.1,46.85 46.85,46.85 47.6,46.85 34.741,47.453 35.491,47.453 36.241,47.453 36.991,47.453 29.1,47.7 30.1,47.7 31.1,47.7 45.35,49.75 46.1,49.75 46.85,49.75 47.6,49.75 29.65,52.85 30.4,52.85 31.15,52.85 31.9,52.85 51.55,56.55 52.25,56.55 52.95,56.55 53.65,56.55 25.6,64.95 28.6,64.95 25.6,65.7 28.6,65.7 25.6,66.45 28.6,66.45 25.6,67.2 28.6,67.2
LED1: 328P.32 R4.1 | length 15.7
  Top Layer w0.25: 328P.32 68.989,50.8 68.85,50.661 68.85,46.95 76.75,39.05 R4.1 R4.1@77.13,39.1
LED2: 328P.1 R5.1 | length 12.2
  Top Layer w0.25: 328P.1 70.55,46.45 70.55,46.35 76.65,40.25 R5.1
MISO: 328P.16 ISP.3 | length 9.4
  Top Layer w0.25: 328P.16 84.87,56.4 ISP.3
MOSI: 328P.15 ISP.2 | length 8.9
  Top Layer w0.25: 328P.15 82.5,55.6 82.81,55.29 ISP.2
MTR_1: C24.2 C25.2 C26.2 C27.2 C28.1 C29.1 C30.1 C31.1 C32.1 C33.1 D2.1 L2.2 L3.1 R9.1 | length 62
  Top Layer w0.25: C24.2 46.35,26.35 46.65,26.05 ; 47.35,26.05 C27.2 ; 48.35,26.05 C26.2 ; 49.35,26.05 C25.2 ; C29.1 55.1,26.05 ; C28.1 56.35,25.8 56.6,26.05
  Top Layer w1: L3.1 45,23.05 46.65,24.7 46.65,26.05 ; R9.1 43.5,26.05 46.65,26.05 ; D2.1@51.1,22.45 51.1,25.85 51.3,26.05 ; L2.2@51.5,36.25 55.257,36.25 ; C32.1 54.018,48.007 55.807,48.007 56.393,47.421 56.393,46.05 56.393,44.093 55.257,42.957 55.257,36.25 ; C30.1 58.234,29.55 57.984,29.8 ; 46.65,26.05 47.35,26.05 48.35,26.05 49.35,26.05 51.3,26.05 ; 51.3,26.05 55.1,26.05 56.6,26.05 57.984,27.434 57.984,28.8 57.984,29.8 ; 55.257,36.25 55.257,34.05 57.391,31.916 57.398,31.916 57.984,31.33 57.984,29.8
MTR_2: C34.1 D3.1 L3.5 MTR.1 R9.2 | length 37.9
  Top Layer w1: MTR.1 27.5,15.3 26.1,15.3 25.4,16 25.4,18.4 ; C34.1 25.4,18.4 ; D3.1 30.85,29.2 ; R9.2 35.4,26.25 ; L3.5 37.575,23.125 36.275,23.125 35.4,24 35.4,26.25 ; 25.4,18.4 25.4,27.5 27.1,29.2 30.85,29.2 ; 30.85,29.2 34.5,29.2 35.4,28.3 35.4,26.25
Net328P_7: 328P.7 CLK.1 | length 4.1
  Top Layer w0.25: CLK.1@74.85,45.85 74.925,45.925 74.925,46.725 75.65,47.45 75.65,48.55 75.407,48.793 75.407,49.393 328P.7
Net328P_8: 328P.8 CLK.3 | length 3.4
  Top Layer w0.25: 328P.8@76.15,48.969 328P.8 ; 328P.8@76.207,48.793 76.45,48.55 76.45,47.45 77.175,46.725 77.175,46.425 CLK.3@77.25,46.35
Net328P_10: 328P.10 R11.2 | length 41.8
  Top Layer w0.25: R11.2 63.1,26.3 64.85,28.05 68.85,28.05 v1(78.55,37.75) ; 328P.10 79.323,51.6 79.598,51.875 80.883,51.875 82.95,49.808 82.95,44.25 v1(81.35,42.65)
  Bottom Layer w0.25: v1(78.55,37.75) 81.35,40.55 v1(81.35,42.65)
Net328P_20: 328P.20 C0.2 | length 1.6
  Top Layer w0.25: 328P.20 73.775,57.775 73.775,58.575 74.05,58.85 74.05,59.25
NetC34_2: C34.2 D3.2 L3.4 MTR.2 R8.2 | length 3.1
  Top Layer w1: 34.95,19.7 35.8,20.55 L3.4
NetC35_1: C35.1 R10.2 | length 1.5
  Top Layer w1: R10.2@58.8,19 58.8,20.5
NetJ2_5: J2.5 R5.2 | length 10.6
  Top Layer w0.25: R5.2 78.65,40.25 80.347,38.553 80.347,34.302 81.928,32.722 J2.5
NetJ2_7: J2.7 R4.2 | length 12.4
  Top Layer w0.25: R4.2 78.65,39.05 79.6,38.1 79.6,33.7 81.05,32.25 81.05,30.328 81.196,30.182 J2.7
NetL3_3: L3.3 Q.3 R8.1 R10.1 | length 23.1
  Top Layer w0.5: 62.05,15.25 Q.3
  Top Layer w1: R8.1@43.25,16.9 43.25,17.9 R8.1@43.475,18.125 ; 44.1,16 44.85,15.25 58.8,15.25 ; 58.8,16.5 58.8,15.25 ; 62.05,15.25 58.8,15.25
NetLED1_2: LED1.2 R13.2 | length 2.7
  Top Layer w0.25: LED1.2@88.8,45.7 R13.2
NetLED2_2: LED2.2 R14.2 | length 2.7
  Top Layer w0.25: LED2.2@85.1,45.8 R14.2
RST: 328P.29 ISP.1 R3.2 | length 37.2
  Top Layer w0.25: R3.2 64.4,61.15 65.3,60.25 65.3,56.747 66.95,55.097 v1(66.95,54.35) 66.95,53.65 67.4,53.2 328P.29 ; v1(70.95,53.05) v1(75.85,53.05) ; v1(79.3,53.6) 83.166,53.6 83.746,53.02 86.03,53.02 ISP.1
  Bottom Layer w0.25: v1(66.95,54.35) 66.95,53.65 67.55,53.05 v1(70.95,53.05) ; v1(75.85,53.05) 78.75,53.05 v1(79.3,53.6)
RX: 328P.30 UART.3 | length 9.4
  Top Layer w0.25: UART.3 63.315,56.29 67.205,52.4 328P.30
SCK: 328P.17 ISP.4 | length 12.1
  Top Layer w0.25: 328P.17 76.15,58.069 76.289,58.207 78.493,58.207 79.252,57.448 81.358,57.448 84.28,60.37 ISP.4
SCL: 328P.28 I2C1.1 I2C2.1 R2.2 | length 43.4
  Top Layer w0.25: R2.2 65.25,62.15 65.75,61.65 65.75,58.076 66.763,57.063 ; v1(66.35,56.65) 66.763,57.063 ; v1(67.65,57.95) 67.65,60.447 68.75,61.547 ; I2C1.1 68.75,65.55 68.75,61.547 ; 328P.28 67.746,54 67.613,54.133 67.613,56.213 66.763,57.063 ; I2C2.1 81.35,65.51 81.35,62.5 80.397,61.547 68.75,61.547
  Bottom Layer w0.25: v1(66.35,56.65) v1(67.65,57.95)
SDA: 328P.27 I2C1.2 I2C2.2 R1.2 | length 36.4
  Top Layer w0.25: R1.2 59.07,63.1 R1.2@59.195,62.975 ; R1.2@59.222,63.15 64.96,63.15 66.26,61.85 ; I2C1.2 66.26,61.85 ; v1(67.75,62.75) 66.26,61.26 ; 328P.27 68.1,54.8 68.1,56.363 66.65,57.813 66.26,58.203 66.26,61.26 ; v1(69.55,63.25) 70.05,62.75 78.05,62.75 78.85,63.55 I2C2.2 ; 66.26,61.26 66.26,61.85
  Bottom Layer w0.25: v1(67.75,62.75) 67.805,62.75 68.255,63.2 69.5,63.2 v1(69.55,63.25)
TX: 328P.31 UART.2 | length 8.6
  Top Layer w0.25: UART.2 64.185,53.75 66.335,51.6 328P.31
V_LG: 328P.4 328P.6 328P.18 C10.2 C11.2 C12.2 C13.2 C14.1 C15.1 C16.1 C36.2 C37.2 C38.2 I2C1.3 I2C2.3 ISP.6 L1.2 R1.1 R2.1 R3.1 R6.1 R7.1 R13.1 | length 131.5
  Top Layer w0.25: L1.2@49.2,62.05 51.85,62.05 ; C16.1 52.275,60.5 51.85,60.925 51.85,62.05 ; C14.1 52.85,62.2 52.7,62.05 ; C15.1 54.35,62.2 54.2,62.05 ; R1.1@57.862,63.2 56.4,63.2 55.25,62.05 54.2,62.05 ; 328P.4 72.95,48.45 73.106,48.294 73.106,47.806 72.95,47.65 72.95,47.045 73.4,46.595 ; 328P.6 74.55,49 75.2,48.35 75.2,47.636 74.158,46.595 73.4,46.595 ; 328P.18@75.407,57.807 328P.18 75.293,57.807 75.293,58.707 75.15,58.85 75.15,59.504 75.321,59.675 81.075,59.675 84.05,62.65 84.05,68.55 ; v1(78.55,49.75) 78.55,45.003 78.653,44.9 ; R6.1@78.7,43.529 78.653,43.576 78.653,44.9 ; v1(80.15,51.25) 80.2,51.25 81.6,49.85 R7.1@81.6,48.829 ; v1(82.25,52.65) 83.097,52.65 84.797,50.95 88.65,50.95 ; R13.1 88.8,51.1 88.85,51.15 ; 51.85,62.05 52.7,62.05 ; 52.7,62.05 54.2,62.05 ; 73.4,46.595 73.4,46.5 73.946,45.954 73.946,44.844 75.311,43.479 77.232,43.479 78.653,44.9
  Top Layer w1: R1.1@57.862,63.2 57.862,67.964 58.447,68.55 63.75,68.55 ; I2C1.3 63.72,68.52 63.75,68.55 ; I2C2.3 76.31,68.51 76.35,68.55 ; ISP.6 88.75,65.45 88.85,65.55 ; 88.85,51.15 88.85,65.55 ; 63.75,68.55 76.35,68.55 ; 76.35,68.55 84.05,68.55 88.15,68.55 88.85,67.85 88.85,65.55
  Bottom Layer w0.25: v1(78.55,49.75) 78.6,49.75 80.1,51.25 v1(80.15,51.25) 81.55,52.65 v1(82.25,52.65) ; ISP.6@86.134,65.284 ISP.6
VCC: C1.1 C2.1 C3.2 C4.2 C5.2 C6.2 C7.2 C8.2 C9.2 C17.2 C18.2 C19.2 C20.2 C21.2 C22.2 C23.2 D1.1 DC.1 L1.1 L2.1 | length 75
  Top Layer w0.25: C4.2 33.85,56.15 ; C18.2 35.85,38.05 ; C19.2 35.6,39.3 35.85,39.05 ; C20.2 35.686,35.8 35.85,35.636 ; C22.2 35.85,36.8 ; C6.2 35.85,57.55 ; C7.2 35.85,58.8 ; C8.2 35.85,60.05 ; C9.2 35.85,61.3 ; C5.2 35.85,56.2 ; C21.2 37.1,34.882 37.268,35.05 ; C23.2 38.1,35.05
  Top Layer w1: C2.1 25.6,41.3 26.1,41.8 30.1,41.8 ; 26.307,43.35 26.307,49.743 DC.1 26.1,55.286 C1.1@27.014,56.2 ; C1.1@27.1,59.175 27.014,59.089 C1.1@27.014,56.2 ; C17.2 30.1,41.8 ; C3.2 30.781,56.199 ; D1.1 35.85,40.05 ; L1.1@38.1,62.05 37.85,61.8 36.686,61.8 36.1,61.214 36.1,56.45 35.85,56.2 C1.1@27.014,56.2 ; L2.1@40.4,36.25 40.4,36.1 39.35,35.05 38.1,35.05 37.268,35.05 36.436,35.05 35.85,35.636 35.85,36.8 35.85,38.05 35.85,39.05 35.85,40.05 ; 30.1,41.8 31.1,41.8 32.1,40.8 35.1,40.8 35.85,40.05
pads on no net: 328P.12 328P.13 328P.14 328P.19 328P.22 328P.23 328P.24 328P.25 328P.26

## Polygon pours and split planes (outlines as drawn)
V_LG on Top Layer "V_LG_L01_P008" (solid, remove dead copper, pour order 8): 48.846,59.554 48.4,60 48.4,64.05 48.45,64.1 51.05,64.1 51.15,63.95 56.85,63.95 57.45,64.55 58.35,64.55 58.35,63.95 58.35,59.85 58.346,59.85 58.05,59.554
MTR_1 on Top Layer "MTR_1_L01_P022" (solid, remove dead copper, pour order 22): 46.15,24.45 42.05,24.45 41.95,24.55 41.95,28.05 44.35,28.05 45.25,27.15 52.55,27.15 53.05,27.65 53.05,30.05 49.75,33.35 49.75,41.25 52.55,44.05 52.55,49.75 53.05,50.25 56.05,50.25 56.65,49.75 56.65,44.05 58.95,41.75 61.35,41.75 61.35,27.85 57.35,23.85 54.35,23.85 54.35,22.75 52.65,21.05 49.55,21.05
VCC on Top Layer "VCC_L01_P011" (solid, pour order 11): 25.55,54.45 25.15,54.85 25.15,57.55 26.05,58.45 28.45,58.45 29.55,57.35 29.55,56.95 34.55,56.95 34.75,57.15 34.75,62.95 35.9,64.1 37.85,64.1 37.85,55.55 36.75,54.45
NetL3_3 on Top Layer "NETL3_3_L01_P026" (solid, remove dead copper, pour order 26): 44.95,19.9 43.725,20.962 42.5,20.962 42.5,14.8 44.95,14.8
NetC34_2 on Top Layer "NETC34_2_L01_P031" (solid, remove dead copper, pour order 31): 29.2,22.4 32.6,22.4 36.4,18.6 37.8,18.6 37.8,14.8 35.9,14.8 35.2,14.1 29.2,14.1
GND on Top Layer "GND_L01_P016" (solid, remove dead copper, pour order 16): 28.95,67.85 28.95,64.45 25.25,64.45 25.25,67.85
GND on Top Layer "GND_L01_P025" (solid, remove dead copper, pour order 25): 49.55,16.85 49.55,18.25 52.65,18.25 52.65,16.85
GND on Top Layer "GND_L01_P024" (solid, remove dead copper, pour order 24): 62.65,31.05 63.85,31.05 64.35,30.65 64.35,28.45 63.85,28.05 62.65,28.05
GND on Top Layer "GND_L01_P023" (solid, remove dead copper, pour order 23): 67.45,39.75 63.95,39.75 63.95,36.15 67.45,36.15
GND on Top Layer "GND_L01_P019" (solid, remove dead copper, pour order 19): 28.55,46.95 28.55,48.05 31.65,48.05 31.65,46.95
GND on Top Layer "GND_L01_P018" (solid, remove dead copper, pour order 18): 29.227,51.954 29.227,53.454 32.327,53.454 32.327,51.954
GND on Top Layer "GND_L01_P015" (solid, remove dead copper, pour order 15): 23.75,31.65 27.45,31.65 27.45,35.05 23.75,35.05
VCC on Top Layer "VCC_L01_P014" (solid, remove dead copper, pour order 14): 24.55,41.05 32.65,41.05 33.85,39.85 33.85,35.05 35.85,33.05 39.55,33.05 40.65,34.15 40.65,43.05 38.45,45.25 26.75,45.25 24.55,42.55
GND on Top Layer "GND_L01_P013" (solid, pour order 13): 44.85,50.15 44.85,46.45 48.25,46.45 48.25,50.15
GND on Top Layer "GND_L01_P012" (solid, pour order 12): 34.35,48.65 34.35,47.05 37.35,47.05 37.35,48.65
GND on Top Layer "GND_L01_P010" (solid, remove dead copper, pour order 10): 51.05,57.65 54.15,57.65 54.15,56.05 51.05,56.05
GND on Top Layer "GND_L01_P007" (solid, remove dead copper, pour order 7): 19.35,44.7 25.35,44.7 25.35,46.45 25.1,46.45 22.1,49.45 22.1,52.2 19.35,52.2
GND on Bottom Layer "Bottom Layer-GND" (solid, remove dead copper, pour order 6): 79.6,28.8 90.6,28.8 90.6,70.05 19.35,69.95 19.35,50.55 19.1,50.55 19.1,13.8 78.6,13.8 78.6,30.8 78.6,32.8 65.35,46.05 57.35,46.05 57.35,48.05 54.85,50.55 27.85,50.55 27.85,51.3 55.1,51.3 58.1,48.3 58.1,46.8 65.85,46.8 79.6,33.05

## Silkscreen, mask and mechanical layers (free items; w line width, h text height)
Top Overlay:
  text "GND" at 61.584,67.3 h1.5 r90
  text "5V" at 64.334,67.3 h1.5 r90
  text "SDA" at 66.834,67.3 h1.5 r90
  text "SCL" at 69.334,67.3 h1.5 r90
  text "GND" at 74.084,67.3 h1.5 r90
  text "5V" at 76.834,67.3 h1.5 r90
  text "SDA" at 79.334,67.3 h1.5 r90
  text "SCL" at 81.834,67.3 h1.5 r90
  text "5V" at 87.85,65.066 h1.5
  text "GND" at 87.85,62.316 h1.5
  text "SCL" at 87.85,59.816 h1.5
  text "MISO" at 87.85,57.316 h1.5
  text "RX" at 58.15,56.05 h1.52
  text "MOSI" at 87.85,54.816 h1.5
  text "TX" at 58.15,53.25 h1.52
  text "RST" at 87.85,52.316 h1.5
  text "GND" at 57.05,50.65 h1.52
  text "PWR" at 91.1,43.5 h1.52 r90
  text "DBG" at 87.234,43.45 h1.5 r90
  text "CTRL1" at 87.35,37.316 h1.5
  text "CTRL2" at 87.35,34.816 h1.5
  text "LED1" at 87.35,32.3 h1.5
  text "LED2" at 87.35,29.8 h1.5
  text "Plant Watering System  / Rev. 3.1" at 71.6,16.3 h1.52
  text "M+" at 26.7,12.9 h1.5
  text "M-" at 29.5,12.9 h1.5
Mechanical 1:
  the board outline again, w0.2

## Dimensions
15.6,11.9 to 15.6,77.9 on Mechanical 1
15.6,11.9 to 93.6,77.9 on Mechanical 1